# Altium PCB EEM_FMC_Carrier.PcbDoc (part 11 of 19)
Units mm, origin at the board's own origin, x right, y up, seen from the top; angles counter-clockwise.
Board outline 222.9 x 100 mm, 6 copper layers (TopLayer, MidLayer1, MidLayer2, SignalLayer1, Internal Plane 1, BottomLayer), stack 1.528 mm thick; 790 components, 743 nets, 3570 pads, 2277 vias.
Unrouted connection lines stored in the file: 3.
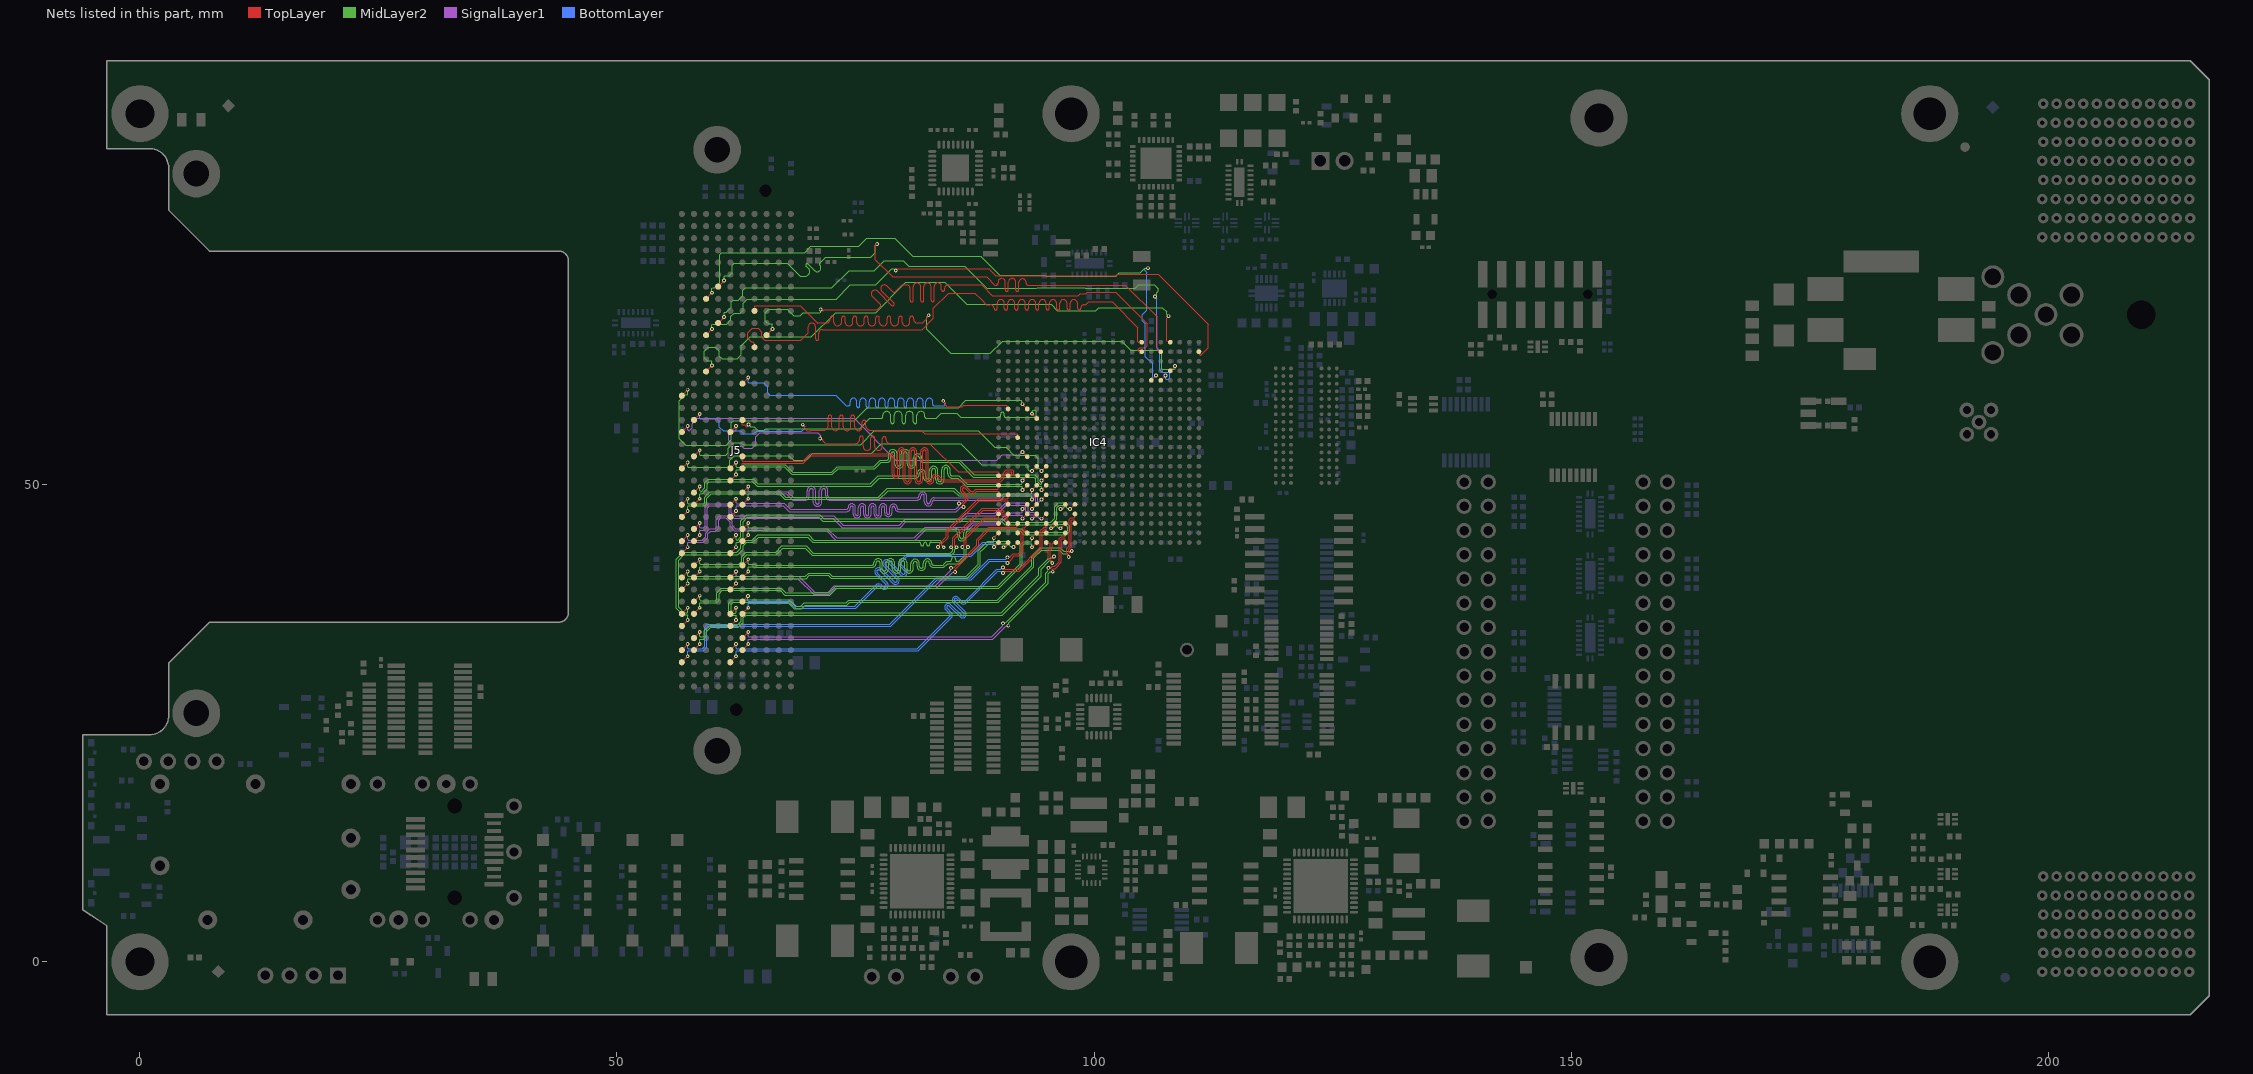
[diagram p13: the nets of this part, all layers, seen from the top]

## Via types
v1: diameter 0.4, hole 0.2, TopLayer to BottomLayer, tented both sides, 1032 vias
v2: diameter 0.5, hole 0.2, TopLayer to BottomLayer, tented both sides, 979 vias
v3: diameter 0.5, hole 0.2, TopLayer to BottomLayer, 162 vias
v4: diameter 0.8, hole 0.5, TopLayer to BottomLayer, tented both sides, 102 vias
v5: diameter 0.6, hole 0.3, TopLayer to BottomLayer, tented both sides, 2 vias

## Nets (pads, with @x,y where several pads share a name; then routed paths per layer and width w, separated by ;. In a path a pad name is that pad's centre, name@x,y a point inside that pad or via, vN(x,y) a via of type N, cw(c..) or ccw(c..) an arc to the next point about the centre after c; other vN are vias at no path point) (continued)
FMC.HA_P16: IC4.H2 J5.e15 | length 44.7
  TopLayer w0.085: J5.e15@63.148,60.609 63.758,61.219 v1(63.758,61.24) ; v1(84.2,58.802) 84.2,58.779 84.385,58.594 84.385,58.389 84.582,58.192 86.192,58.192 86.344,58.344 87.387,58.344 ; 87.412,58.344 90.787,58.344 90.919,58.212 90.919,58.029 IC4.H2@90.998,57.95
  BottomLayer w0.085: v1(63.758,61.24) 63.758,60.761 63.808,60.711 65.389,60.711 65.8,60.3 65.8,59.65 66.038,59.412 72.913,59.412 74.025,58.3 74.142,58.3 74.29,58.3 ccw(c74.29,58.442) 74.433,58.442 74.433,58.72 cw(c74.787,58.72) 74.787,59.074 cw(c74.787,58.72) 75.142,58.72 75.142,58.244 ccw(c75.284,58.244) 75.284,58.101 ccw(c75.284,58.244) 75.427,58.244 75.427,58.72 cw(c75.781,58.72) 75.781,59.074 cw(c75.781,58.72) 76.136,58.72 76.136,58.244 ccw(c76.278,58.244) 76.278,58.101 ccw(c76.278,58.244) 76.421,58.244 76.421,58.72 cw(c76.775,58.72) 76.775,59.074 cw(c76.775,58.72) 77.13,58.72 77.13,58.244 ccw(c77.272,58.244) 77.272,58.101 ccw(c77.272,58.244) 77.415,58.244 77.415,58.72 cw(c77.769,58.72) 77.769,59.074 cw(c77.769,58.72) 78.124,58.72 78.124,58.244 ccw(c78.266,58.244) 78.266,58.101 ccw(c78.266,58.244) 78.409,58.244 78.409,58.72 cw(c78.763,58.72) 78.763,59.074 cw(c78.763,58.72) 79.118,58.72 79.118,58.244 ccw(c79.26,58.244) 79.26,58.101 ccw(c79.26,58.244) 79.403,58.244 79.403,58.72 cw(c79.757,58.72) 79.757,59.074 cw(c79.757,58.72) 80.112,58.72 80.112,58.244 ccw(c80.254,58.244) 80.254,58.101 ccw(c80.254,58.244) 80.397,58.244 80.397,58.72 cw(c80.751,58.72) 80.751,59.074 cw(c80.751,58.72) 81.106,58.72 81.106,58.244 ccw(c81.248,58.244) 81.248,58.101 ccw(c81.248,58.244) 81.391,58.244 81.391,58.72 cw(c81.745,58.72) 81.745,59.074 cw(c81.745,58.72) 82.1,58.72 82.1,58.244 ccw(c82.242,58.244) 82.242,58.101 ccw(c82.242,58.244) 82.385,58.244 82.385,58.72 cw(c82.739,58.72) 82.739,59.074 cw(c82.739,58.72) 83.094,58.72 83.094,58.442 ccw(c83.236,58.442) 83.236,58.3 84.22,58.3 84.349,58.3 84.399,58.35 84.399,58.608 84.205,58.802 v1(84.2,58.802)
FMC.HA_P17: IC4.H4 J5.k16 | length 46.8
  TopLayer w0.085: J5.k16@56.798,59.339 57.408,59.949 v1(57.408,59.97) ; v1(92.498,58.45) IC4.H4@92.998,57.95
  MidLayer2 w0.11: v1(57.408,59.97) 57.408,59.518 57.344,59.454 57.154,59.454 56.513,58.812 56.513,54.827 57.184,54.156 61.431,54.156 61.975,54.7 61.975,56.5 62.213,56.738 74.888,56.738 76.25,58.1 85.825,58.1 86.563,58.838 88.498,58.838 89.474,58.838 92.378,58.838 92.442,58.774 92.442,58.506 v1(92.498,58.45)
FMC.HA_P18: IC4.L3 J5.j18 | length 47.2
  TopLayer w0.085: J5.j18@58.068,56.799 58.678,57.409 v1(58.678,57.43) ; v1(69.473,56.3) 69.473,56.294 69.667,56.1 69.667,55.937 69.804,55.8 69.916,55.688 70.292,55.688 70.342,55.738 71.575,55.738 71.724,55.738 ccw(c71.724,56.142) 72.128,56.142 72.128,57.104 cw(c72.321,57.104) 72.321,57.296 cw(c72.321,57.104) 72.513,57.104 72.513,56.083 ccw(c72.918,56.083) 72.918,55.679 ccw(c72.918,56.083) 73.322,56.083 73.322,57.104 cw(c73.515,57.104) 73.515,57.296 cw(c73.515,57.104) 73.707,57.104 73.707,56.083 ccw(c74.112,56.083) 74.112,55.679 ccw(c74.112,56.083) 74.516,56.083 74.516,57.104 cw(c74.709,57.104) 74.709,57.296 cw(c74.709,57.104) 74.901,57.104 74.901,56.083 ccw(c75.306,56.083) 75.306,55.679 ccw(c75.306,56.083) 75.71,56.083 75.71,56.584 cw(c75.903,56.584) 75.903,56.776 cw(c75.903,56.584) 76.095,56.584 76.095,56.142 ccw(c76.5,56.142) 76.5,55.738 77.491,55.738 81.122,55.738 81.837,55.738 82.242,55.333 91.948,55.333 91.998,55.283 IC4.L3@91.998,54.95
  BottomLayer w0.085: v1(58.678,57.43) 58.678,56.951 58.728,56.901 60.449,56.901 60.65,56.7 60.737,56.613 60.737,56.025 61.112,55.65 62.975,55.65 63.294,55.331 64.332,55.331 64.625,55.625 69.375,55.625 69.667,55.917 69.667,56.101 69.473,56.295 v1(69.473,56.3)
FMC.HA_P19: IC4.R1 J5.f19 | length 40.9
  TopLayer w0.085: J5.f19@61.878,55.529 62.488,56.139 v1(62.488,56.16) ; v1(71.298,54.849) 71.383,54.849 71.469,54.763 71.505,54.763 71.555,54.713 71.555,54.609 71.778,54.386 71.84,54.325 74.875,54.325 75.024,54.325 ccw(c75.024,54.729) 75.428,54.729 75.428,54.909 cw(c75.621,54.909) 75.621,55.101 cw(c75.621,54.909) 75.813,54.909 75.813,54.021 ccw(c76.218,54.021) 76.218,53.617 ccw(c76.218,54.021) 76.622,54.021 76.622,54.909 cw(c76.815,54.909) 76.815,55.101 cw(c76.815,54.909) 77.007,54.909 77.007,54.021 ccw(c77.412,54.021) 77.412,53.617 ccw(c77.412,54.021) 77.816,54.021 77.816,54.842 cw(c78.009,54.842) 78.009,55.035 cw(c78.009,54.842) 78.201,54.842 78.201,54.729 ccw(c78.606,54.729) 78.606,54.325 79.13,54.325 82.8,54.325 85.781,51.344 89.948,51.344 89.998,51.294 IC4.R1@89.998,50.95
  SignalLayer1 w0.11: v1(62.488,56.16) 62.488,55.757 62.375,55.644 61.952,55.644 61.713,55.405 61.713,54.652 62.302,54.063 63.102,54.063 63.309,53.856 64.156,53.856 64.537,54.237 64.537,55.037 64.975,55.475 71.037,55.475 71.362,55.149 71.362,55.058 71.353,55.049 71.353,54.904 v1(71.298,54.849)
FMC.HA_P20: IC4.J5 J5.e18 | length 42.5
  TopLayer w0.085: J5.e18@63.148,56.799 63.148,56.32 63.198,56.27 63.389,56.27 63.565,56.094 63.636,56.094 63.798,56.256 v1(63.798,56.325) ; v1(93.498,57.45) IC4.J5@93.998,56.95
  MidLayer2 w0.11: v1(63.798,56.325) 63.798,56.312 64.004,56.106 64.369,56.106 64.75,55.725 65.44,55.725 65.59,55.875 75.425,55.875 76.518,56.968 77.5,56.968 77.674,56.968 ccw(c77.674,57.148) 77.854,57.148 77.854,57.273 cw(c78.271,57.273) 78.688,57.273 78.688,56.593 ccw(c78.868,56.593) 79.048,56.593 79.048,57.273 cw(c79.465,57.273) 79.881,57.273 79.881,56.593 ccw(c80.061,56.593) 80.241,56.593 80.241,57.273 cw(c80.658,57.273) 81.075,57.273 81.075,56.593 ccw(c81.255,56.593) 81.435,56.593 81.435,57.273 cw(c81.852,57.273) 82.269,57.273 82.269,57.148 ccw(c82.449,57.148) 82.449,56.968 83.457,56.968 83.506,57.017 83.99,57.5 85.6,57.5 86.025,57.075 89.975,57.075 90.03,57.075 ccw(c90.03,57.255) 90.21,57.255 90.21,57.42 cw(c90.39,57.42) 90.57,57.42 90.57,57.255 ccw(c90.75,57.255) 90.75,57.075 91.2,57.075 93.8,57.075 93.925,57.2 93.925,57.7 93.793,57.832 93.65,57.832 93.531,57.713 93.531,57.483 v1(93.498,57.45)
FMC.HA_P21: IC4.N4 J5.k19 | length 40.1
  TopLayer w0.085: J5.k19@56.798,55.529 57.408,56.139 v1(57.408,56.16) ; v1(92.498,53.45) IC4.N4@92.998,52.95
  SignalLayer1 w0.11: v1(57.408,56.16) 57.408,55.785 57.504,55.689 57.596,55.689 57.866,55.959 57.866,56.391 58.437,56.962 74.848,56.962 79.235,52.575 89.8,52.575 90.375,53.15 91.839,53.15 91.91,53.079 92.127,53.079 v1(92.498,53.45)
FMC.HA_P22: IC4.P6 J5.j21 | length 41.7
  TopLayer w0.085: J5.j21@58.068,52.989 58.678,53.599 v1(58.678,53.62) ; v1(94.498,51.45) IC4.P6@94.998,51.95
  MidLayer2 w0.11: v1(58.678,53.62) 58.678,53.168 58.742,53.104 61.392,53.104 61.663,53.375 61.663,53.823 62.227,54.387 63.048,54.387 63.216,54.219 75.544,54.219 76.975,55.65 87.862,55.65 89.575,53.937 90.788,53.937 91.606,53.119 93.838,53.119 94.167,52.79 94.167,51.951 94.158,51.942 94.158,51.79 v1(94.498,51.45)
FMC.HA_P23: IC4.P5 J5.k22 | length 41.3
  TopLayer w0.085: J5.k22@56.798,51.719 57.408,52.329 v1(57.408,52.35) ; v1(93.498,51.45) IC4.P5@93.998,51.95
  MidLayer2 w0.11: v1(57.408,52.35) 57.408,51.898 57.472,51.834 61.573,51.834 61.813,52.073 61.813,52.598 62.277,53.062 68.013,53.062 68.525,52.55 69.765,52.55 70.54,53.325 76.69,53.325 77.677,54.312 86.013,54.312 88.213,52.112 92.913,52.112 93.116,51.909 93.116,51.575 93.222,51.47 93.478,51.47 v1(93.498,51.45)
FMC.HB_N0: IC4.U5 J5.k26 | length 40.2
  TopLayer w0.085: J5.k26@56.798,46.639 57.408,47.249 v1(57.408,47.27) ; v1(93.498,48.45) IC4.U5@93.998,48.95
  MidLayer2 w0.11: v1(57.408,47.27) 57.408,47.722 57.472,47.787 59.185,47.787 59.425,48.027 59.425,48.588 59.894,49.057 67.007,49.057 67.602,48.463 77.488,48.463 78.413,49.388 85.27,49.388 85.827,48.831 93.434,48.831 93.498,48.767 v1(93.498,48.45)
FMC.HB_N1: IC4.T4 J5.j25 | length 43.6
  TopLayer w0.085: J5.j25@58.068,47.909 58.678,48.519 v1(58.678,48.54) ; v1(92.498,49.45) IC4.T4@92.998,49.95
  MidLayer2 w0.11: v1(58.678,48.54) 58.678,48.992 58.742,49.057 58.932,49.057 59.45,49.575 59.45,50.1 59.675,50.325 64.215,50.325 64.677,49.863 76.663,49.863 77.5,50.7 80.477,50.7 81.249,50.7 ccw(c81.249,51.142) 81.691,51.142 cw(c81.896,51.142) 81.896,51.347 cw(c81.896,51.142) 82.101,51.142 82.101,50.818 ccw(c82.543,50.818) 82.543,50.376 ccw(c82.543,50.818) 82.985,50.818 82.985,51.495 cw(c83.19,51.495) 83.19,51.7 cw(c83.19,51.495) 83.395,51.495 83.395,50.543 ccw(c83.837,50.543) 83.837,50.101 ccw(c83.837,50.543) 84.279,50.543 84.279,51.596 cw(c84.484,51.596) 84.484,51.801 cw(c84.484,51.596) 84.689,51.596 84.689,51.142 ccw(c85.131,51.142) 85.131,50.7 85.74,50.7 86.275,50.165 86.608,49.831 92.4,49.831 92.492,49.74 92.492,49.456 v1(92.498,49.45)
FMC.HB_N2: IC4.T6 J5.f23 | length 43.1
  TopLayer w0.085: J5.f23@61.878,50.449 62.488,51.059 v1(62.488,51.08) ; v1(94.498,49.45) IC4.T6@94.998,49.95
  MidLayer2 w0.11: v1(62.488,51.08) 62.488,51.532 62.553,51.596 63.146,51.596 63.425,51.875 67.54,51.875 68.327,51.088 72.588,51.088 73.181,51.681 77.031,51.681 77.7,52.35 78.1,52.35 78.274,52.35 ccw(c78.274,52.792) 78.716,52.792 78.716,53.239 cw(c78.921,53.239) 78.921,53.444 cw(c78.921,53.239) 79.126,53.239 79.126,52.177 ccw(c79.568,52.177) 79.568,51.735 ccw(c79.568,52.177) 80.009,52.177 80.009,53.239 cw(c80.214,53.239) 80.214,53.444 cw(c80.215,53.239) 80.419,53.239 80.419,52.188 ccw(c80.861,52.188) 80.861,51.746 ccw(c80.861,52.188) 81.303,52.188 81.303,52.792 cw(c81.508,52.792) 81.508,52.997 cw(c81.508,52.792) 81.713,52.792 ccw(c82.155,52.792) 82.155,52.35 83.017,52.35 85.815,52.35 87.352,50.813 93.702,50.813 93.9,50.615 93.9,50.176 94.244,49.831 94.434,49.831 94.498,49.767 v1(94.498,49.45)
FMC.HB_N3: IC4.R2 J5.e22 | length 52.4
  TopLayer w0.085: J5.e22@63.148,51.719 63.148,52.198 63.198,52.248 69.548,52.248 70.35,53.05 78.146,53.05 78.642,53.05 cw(c78.642,52.858) 78.834,52.858 78.834,51.088 ccw(c79.239,51.088) 79.239,50.684 ccw(c79.239,51.088) 79.643,51.088 79.643,53.459 cw(c79.836,53.459) 79.836,53.652 cw(c79.836,53.459) 80.028,53.459 80.028,50.519 ccw(c80.433,50.519) 80.433,50.115 ccw(c80.433,50.519) 80.837,50.519 80.837,53.459 cw(c81.03,53.459) 81.03,53.652 cw(c81.03,53.459) 81.222,53.459 81.222,50.519 ccw(c81.627,50.519) 81.627,50.115 ccw(c81.627,50.519) 82.031,50.519 82.031,53.459 cw(c82.224,53.459) 82.224,53.652 cw(c82.224,53.459) 82.416,53.459 82.416,50.519 ccw(c82.821,50.519) 82.821,50.115 ccw(c82.821,50.519) 83.225,50.519 83.225,50.685 cw(c83.418,50.685) 83.554,50.821 83.777,50.598 83.865,50.51 84.037,50.338 90.225,50.338 90.591,50.704 90.591,51.041 90.907,51.357 91.244,51.357 91.272,51.385 91.342,51.385 91.392,51.335 91.392,51.025 91.326,50.959 91.007,50.959 IC4.R2@90.998,50.95
FMC.HB_N4: IC4.U1 J5.f26 | length 40.9
  TopLayer w0.085: J5.f26@61.878,46.639 62.488,47.249 v1(62.488,47.27) ; v1@86.31,47.668 86.298,47.68 86.298,47.941 86.579,48.221 86.684,48.326 ccw(c86.398,48.612) 86.715,48.863 86.715,48.867 86.685,48.897 ; 86.499,49.628 86.956,49.17 ccw(c87.242,49.456) 87.528,49.17 87.696,49.338 87.909,49.338 89.948,49.338 89.998,49.288 IC4.U1@89.998,48.95 ; 86.498,49.628 ccw(c86.362,49.492) 86.226,49.629 ccw(c86.362,49.492) 86.226,49.356 86.684,48.898
  SignalLayer1 w0.11: v1(62.488,47.27) 62.488,47.7 62.575,47.787 63.299,47.787 63.326,47.813 67.437,47.813 68.062,47.188 73.886,47.188 74.059,47.188 ccw(c74.059,47.58) 74.451,47.58 74.451,47.618 cw(c74.606,47.618) 74.606,47.773 cw(c74.606,47.618) 74.761,47.618 74.761,46.928 ccw(c75.153,46.928) 75.153,46.536 ccw(c75.153,46.928) 75.545,46.928 75.545,47.618 cw(c75.7,47.618) 75.7,47.773 cw(c75.7,47.618) 75.855,47.618 75.855,46.928 ccw(c76.247,46.928) 76.247,46.536 ccw(c76.247,46.928) 76.639,46.928 76.639,47.618 cw(c76.794,47.618) 76.794,47.773 cw(c76.794,47.618) 76.949,47.618 76.949,46.928 ccw(c77.341,46.928) 77.341,46.536 ccw(c77.341,46.928) 77.733,46.928 77.733,47.618 cw(c77.888,47.618) 77.888,47.773 cw(c77.888,47.618) 78.043,47.618 78.043,47.064 ccw(c78.435,47.064) 78.435,46.672 ccw(c78.435,47.064) 78.827,47.064 78.827,47.58 cw(c78.982,47.58) 78.982,47.735 cw(c78.982,47.58) 79.137,47.58 ccw(c79.529,47.58) 79.529,47.188 80.95,47.188 85.581,47.188 86.035,47.642 86.289,47.642 v1(86.31,47.663)
FMC.HB_N5: IC4.V5 J5.e25 | length 40.8
  TopLayer w0.085: J5.e25@63.148,47.909 63.758,48.519 v1(63.758,48.54) ; v1(93.498,47.45) IC4.V5@93.998,47.95
  SignalLayer1 w0.11: v1(63.758,48.54) 63.758,48.992 63.822,49.057 67.743,49.057 68.412,48.388 69.55,48.388 69.724,48.388 ccw(c69.724,48.83) 70.166,48.83 70.166,49.391 cw(c70.371,49.391) 70.371,49.596 cw(c70.371,49.391) 70.576,49.391 70.576,48.186 ccw(c71.018,48.186) 71.018,47.744 ccw(c71.018,48.186) 71.46,48.186 71.46,49.391 cw(c71.664,49.391) 71.664,49.596 cw(c71.665,49.391) 71.87,49.391 71.87,48.83 ccw(c72.311,48.83) 72.311,48.388 73.1,48.388 81.275,48.388 81.449,48.388 ccw(c81.449,48.805) 81.866,48.805 81.866,48.827 cw(c82.046,48.827) 82.226,48.827 82.226,48.208 ccw(c82.643,48.208) 83.06,48.208 cw(c83.24,48.208) 83.24,48.388 84.025,48.388 90.215,48.388 90.657,48.83 93.685,48.83 93.883,48.632 93.883,47.835 v1(93.498,47.45)
FMC.HB_N6: IC4.W4 J5.k29 | length 41.6
  TopLayer w0.085: J5.k29@56.798,42.829 57.408,43.439 v1(57.408,43.46) ; v1(92.498,46.45) IC4.W4@92.998,46.95
  SignalLayer1 w0.11: v1(57.408,43.46) 57.408,43.912 57.472,43.977 59.032,43.977 59.525,44.469 59.525,44.85 59.813,45.138 60.363,45.138 60.65,45.425 60.65,46.3 60.875,46.525 61.425,46.525 61.85,46.1 61.85,45.64 62.315,45.175 71.965,45.175 72.952,44.188 81.273,44.188 82.416,45.331 86.931,45.331 87.388,45.788 90.038,45.788 91.081,46.831 92.434,46.831 92.498,46.767 v1(92.498,46.45)
FMC.HB_N7: IC4.W5 J5.j28 | length 43
  TopLayer w0.085: J5.j28@58.068,44.099 58.678,44.709 v1(58.678,44.73) ; v1(93.498,46.45) IC4.W5@93.998,46.95
  SignalLayer1 w0.11: v1(58.678,44.73) 58.678,45.182 58.742,45.247 59.157,45.247 59.475,45.565 59.475,47.54 59.735,47.8 61.575,47.8 61.763,47.612 61.763,46.977 62.24,46.5 72.64,46.5 73.627,45.513 79.673,45.513 80.291,46.131 86.056,46.131 86.688,46.763 89.713,46.763 90.825,47.875 92.675,47.875 92.863,47.687 92.863,47.162 93.143,46.882 93.673,46.882 93.834,46.721 93.834,46.629 93.71,46.505 93.553,46.505 v1(93.498,46.45)
FMC.HB_N8: IC4.V8 J5.f29 | length 41.1
  TopLayer w0.085: J5.f29@61.878,42.829 62.488,43.439 v1(62.488,43.46) ; v1(96.498,47.45) IC4.V8@96.998,47.95
  MidLayer2 w0.11: v1(62.488,43.46) 62.488,43.912 62.552,43.977 62.742,43.977 63.225,44.46 63.225,46.15 63.675,46.6 71.14,46.6 71.552,46.188 88.498,46.188 90.302,46.188 90.652,45.838 95.548,45.838 96.1,46.39 96.1,47.614 96.368,47.882 96.815,47.882 96.879,47.818 96.879,47.65 96.735,47.505 96.553,47.505 v1(96.498,47.45)
FMC.HB_N9: IC4.Y7 J5.e28 | length 40.6
  TopLayer w0.085: J5.e28@63.148,44.099 63.758,44.709 v1(63.758,44.73) ; v1(95.498,45.45) IC4.Y7@95.998,45.95
  MidLayer2 w0.11: v1(63.758,44.73) 63.758,45.182 63.822,45.247 65.207,45.247 65.291,45.163 84.675,45.163 85.496,45.163 cw(c85.496,44.958) 85.701,44.958 85.701,44.564 ccw(c86.143,44.564) 86.143,44.122 ccw(c86.143,44.564) 86.585,44.564 86.585,44.958 cw(c86.789,44.958) 86.789,45.163 87.544,45.163 92.277,45.163 92.659,44.781 97.091,44.781 97.462,45.152 97.462,45.648 96.991,46.119 96.25,46.119 95.925,45.794 95.925,45.696 95.735,45.505 95.553,45.505 v1(95.498,45.45)
FMC.HB_N10: IC4.AB2 J5.k32 | length 38.8
  TopLayer w0.085: J5.k32@56.798,39.019 57.408,39.629 v1(57.408,39.65) ; v1(90.498,43.458) 90.502,43.458 90.994,43.95 IC4.AB2@90.998,43.95
  MidLayer2 w0.11: v1(57.408,39.65) 57.408,40.102 57.472,40.167 69.842,40.167 70.175,40.5 72.14,40.5 72.44,40.2 86.723,40.2 88.1,41.577 88.1,42.975 88.498,43.373 88.964,43.839 90.733,43.839 90.744,43.85 90.836,43.85 90.9,43.786 90.9,43.645 90.753,43.499 90.539,43.499 v1(90.498,43.458)
FMC.HB_N11: IC4.Y2 J5.j31 | length 39
  TopLayer w0.085: J5.j31@58.068,40.289 58.678,40.899 v1(58.678,40.92) ; v1(85.598,43.458) 85.598,43.464 85.404,43.657 85.404,44.354 88.4,47.35 90.138,47.35 90.395,47.093 90.395,46.718 90.769,46.344 90.948,46.344 90.998,46.294 IC4.Y2@90.998,45.95
  MidLayer2 w0.11: v1(58.678,40.92) 58.678,41.372 58.742,41.437 62.836,41.437 63.3,41.9 63.3,42.375 63.613,42.688 66.713,42.688 67.375,43.35 69.74,43.35 70.477,42.613 85.036,42.613 85.416,42.993 85.416,43.248 85.598,43.43 v1(85.598,43.458)
FMC.HB_N12: IC4.AA3 J5.f32 | length 35.2
  TopLayer w0.085: J5.f32@61.878,39.019 62.488,39.629 v1(62.488,39.65) ; v1(85.448,40.875) 85.451,40.878 85.451,41.153 87.9,43.601 87.9,44.175 89.069,45.344 91.85,45.344 91.939,45.255 91.939,45.009 IC4.AA3@91.998,44.95
  SignalLayer1 w0.11: v1(62.488,39.65) 62.488,40.102 62.552,40.167 68.972,40.167 70.631,38.507 72.232,38.507 72.888,39.163 83.479,39.163 85.172,40.855 85.428,40.855 v1(85.448,40.875)
FMC.HB_N13: IC4.Y1 J5.e31 | length 39.4
  TopLayer w0.085: J5.e31@63.148,40.289 63.758,40.899 v1(63.758,40.92) ; v1(86.798,43.477) 86.798,43.481 86.604,43.675 86.604,44.379 88.498,46.273 88.569,46.344 89.948,46.344 89.998,46.294 IC4.Y1@89.998,45.95
  MidLayer2 w0.11: v1(63.758,40.92) 63.758,41.372 63.822,41.437 64.346,41.437 64.436,41.346 76.55,41.346 76.724,41.346 ccw(c76.724,41.788) 77.166,41.788 77.166,41.807 cw(c77.371,41.807) 77.371,42.012 cw(c77.371,41.807) 77.576,41.807 77.576,41.188 ccw(c78.018,41.188) 78.018,40.746 ccw(c78.018,41.188) 78.46,41.188 78.46,41.807 cw(c78.664,41.807) 78.664,42.012 cw(c78.665,41.807) 78.869,41.807 78.869,41.188 ccw(c79.311,41.188) 79.311,40.746 ccw(c79.311,41.188) 79.753,41.188 79.753,41.807 cw(c79.958,41.807) 79.958,42.012 cw(c79.958,41.807) 80.163,41.807 80.163,41.188 ccw(c80.605,41.188) 80.605,40.746 ccw(c80.605,41.188) 81.047,41.188 81.047,41.751 cw(c81.252,41.751) 81.252,41.956 cw(c81.252,41.751) 81.457,41.751 81.457,41.465 ccw(c81.899,41.465) 81.899,41.023 ccw(c81.899,41.465) 82.341,41.465 82.341,41.788 cw(c82.546,41.788) 82.546,41.993 cw(c82.546,41.788) 82.751,41.788 ccw(c83.193,41.788) 83.193,41.346 83.725,41.346 84.271,41.346 84.65,41.725 85.91,41.725 86.616,42.431 86.616,43.267 86.798,43.449 v1(86.798,43.477)
FMC.HB_N14: IC4.V2 J5.k35 | length 48
  TopLayer w0.085: J5.k35@56.798,35.209 57.408,35.819 v1(57.408,35.84) ; v1(84.248,43.458) 84.248,43.471 84.058,43.661 84.058,43.809 84.717,44.469 84.717,45.082 87.973,48.338 90.948,48.338 90.998,48.288 IC4.V2@90.998,47.95
  MidLayer2 w0.11: v1(57.408,35.84) 57.408,36.292 57.344,36.357 56.908,36.357 56.213,37.052 56.213,42.213 56.919,42.919 62.559,42.919 62.988,43.348 62.988,43.723 63.477,44.212 64.202,44.212 64.752,44.762 70.088,44.762 70.638,44.212 81.325,44.212 83.853,44.212 84.066,43.998 84.066,43.667 84.248,43.486 v1(84.248,43.458)
FMC.HB_N15: IC4.AB5 J5.j34 | length 41.8
  TopLayer w0.085: J5.j34@58.068,36.479 58.678,37.089 v1(58.678,37.11) ; v1(93.498,43.45) IC4.AB5@93.998,43.95
  MidLayer2 w0.11: v1(58.678,37.11) 58.678,37.562 58.742,37.627 60.427,37.627 60.7,37.9 60.7,38.6 61.032,38.932 67.107,38.932 67.608,38.432 72.307,38.432 73.013,39.138 90.023,39.138 92.5,41.615 92.5,43.6 92.71,43.81 93.434,43.81 93.498,43.746 v1(93.498,43.45)
FMC.HB_N16: IC4.Y9 J5.f35 | length 47.5
  TopLayer w0.085: J5.f35@61.878,35.209 62.488,35.819 v1(62.488,35.84) ; v1(97.671,43.056) 97.641,43.056 97.463,42.878 97.384,42.878 97.334,42.928 97.334,43.254 97.592,43.512 97.592,46.294 97.642,46.344 97.948,46.344 97.998,46.294 IC4.Y9@97.998,45.95
  MidLayer2 w0.11: v1(62.488,35.84) 62.488,36.261 62.424,36.326 62.089,36.326 61.716,36.699 61.716,37.576 62.077,37.937 68.013,37.937 68.7,37.25 69.275,37.25 69.643,37.618 74.007,37.618 74.302,37.912 89.875,37.912 93.463,41.5 93.463,42.448 93.465,42.45 94.402,43.387 96.448,43.387 96.814,43.021 97.363,43.021 97.37,43.014 97.629,43.014 v1(97.671,43.056)
FMC.HB_N17: IC4.AA4 J5.k38 | length 45.3
  TopLayer w0.085: J5.k38@56.798,31.399 57.408,32.009 v1(57.408,32.03) ; v1(90.923,41.8) 91,41.8 91.322,42.122 91.322,42.222 91.638,42.538 92.138,42.538 92.591,42.992 92.591,45.259 92.641,45.309 92.81,45.309 92.919,45.2 92.919,45.029 IC4.AA4@92.998,44.95
  BottomLayer w0.085: v1(57.408,32.03) 57.408,32.563 57.458,32.613 59.038,32.613 59.4,32.975 59.4,35 59.563,35.163 78.688,35.163 83.575,40.05 87.125,40.05 89.069,41.994 90.018,41.994 90.724,41.994 90.918,41.8 v1(90.923,41.8)
FMC.HB_N18: IC4.AB6 J5.j37 | length 45.5
  TopLayer w0.085: J5.j37@58.068,32.669 58.678,33.279 v1(58.678,33.3) ; IC4.AB6@94.998,43.95 95.045,43.903 95.314,43.903 95.392,43.825 95.392,43.375 95.221,43.204 95.221,42.298 95.447,42.072 95.49,42.072 95.54,42.023 95.54,41.99 95.628,41.902 v1(95.628,41.817)
  MidLayer2 w0.11: v1(58.678,33.3) 58.678,33.752 58.742,33.817 59.092,33.817 59.375,34.1 59.375,34.59 59.848,35.063 62.698,35.063 63.25,35.615 63.25,36.075 63.525,36.35 90.385,36.35 94.45,40.415 94.45,41.147 95.327,42.024 95.418,42.024 95.566,41.876 95.628,41.876 v1(95.628,41.817)
FMC.HB_N19: IC4.AB1 J5.e34 | length 41.1
  TopLayer w0.085: J5.e34@63.148,36.479 63.148,36.489 63.758,37.099 v1(63.758,37.11) ; v1(89.525,43.477) IC4.AB1@89.998,43.95
  BottomLayer w0.085: v1(63.758,37.11) 63.742,37.126 63.742,37.55 63.792,37.6 68.175,37.6 68.725,37.05 75,37.05 76.7,38.75 77.287,39.337 cw(c77.423,39.201) 77.56,39.337 77.734,39.163 ccw(c78.02,39.449) 78.306,39.163 78.307,39.164 ccw(c78.02,39.449) 78.306,39.735 77.287,40.754 cw(c77.423,40.89) 77.287,41.026 cw(c77.423,40.89) 77.559,41.026 78.896,39.689 ccw(c79.182,39.975) 79.468,39.689 79.469,39.69 ccw(c79.182,39.975) 79.468,40.261 78.131,41.598 cw(c78.267,41.734) 78.131,41.87 cw(c78.267,41.734) 78.403,41.87 79.74,40.533 ccw(c80.026,40.819) 80.313,40.533 80.314,40.534 ccw(c80.026,40.819) 80.313,41.105 79.82,41.598 cw(c79.956,41.734) 79.82,41.87 79.925,41.975 80.45,42.5 87.15,42.5 88.413,43.763 88.498,43.763 89.418,43.763 89.468,43.713 89.468,43.533 v1(89.525,43.477)
FMC.HB_N20: IC4.AA6 J5.f38 | length 46.4
  TopLayer w0.085: J5.f38@61.878,31.399 62.488,32.009 v1(62.488,32.03) ; v1(90.448,40.744) 90.454,40.744 90.648,40.938 92.186,40.938 94.592,43.344 94.592,45.079 94.857,45.344 94.948,45.344 94.998,45.294 IC4.AA6@94.998,44.95
  BottomLayer w0.085: v1(62.488,32.03) 62.488,32.532 62.538,32.582 81.554,32.582 84.936,35.964 85.042,36.07 ccw(c84.773,36.337) 85.041,36.605 84.596,37.051 cw(c84.714,37.169) 84.596,37.288 cw(c84.714,37.169) 84.833,37.288 85.97,36.151 ccw(c86.238,36.419) 86.505,36.15 86.507,36.152 ccw(c86.238,36.419) 86.506,36.688 85.396,37.798 cw(c85.514,37.917) 85.396,38.035 cw(c85.514,37.917) 85.633,38.035 86.051,37.617 ccw(c86.32,37.884) 86.588,37.616 86.952,37.98 89.91,40.938 90.249,40.938 90.443,40.744 v1(90.448,40.744)
FMC.HB_N21: IC4.AB8 J5.e37 | length 41.7
  TopLayer w0.085: J5.e37@63.148,32.669 63.758,33.279 v1(63.758,33.3) ; v1(95.672,40.894) 95.675,40.897 95.675,41.171 95.729,41.225 95.95,41.225 96.591,41.867 96.591,44.294 96.641,44.344 96.948,44.344 96.998,44.294 IC4.AB8@96.998,43.95
  MidLayer2 w0.11: v1(91.018,35.231) 91.048,35.261 91.048,35.548 95.179,39.679 95.179,40.657 95.243,40.722 95.395,40.874 95.652,40.874 v1(95.672,40.894)
  SignalLayer1 w0.11: v1(63.758,33.3) 63.758,33.752 63.822,33.817 89.392,33.817 90.764,35.189 90.976,35.189 v1(91.018,35.231)
FMC.HB_P0: IC4.T5 J5.k25 | length 40.2
  TopLayer w0.085: J5.k25@56.798,47.909 57.408,48.519 v1(57.408,48.54) ; v1(93.498,49.45) IC4.T5@93.998,49.95
  MidLayer2 w0.11: v1(57.408,48.54) 57.408,48.088 57.472,48.024 59.087,48.024 59.188,48.125 59.188,48.686 59.796,49.294 67.106,49.294 67.7,48.7 77.39,48.7 78.315,49.625 85.368,49.625 85.925,49.068 93.434,49.068 93.498,49.133 v1(93.498,49.45)
FMC.HB_P1: IC4.R4 J5.j24 | length 43.6
  TopLayer w0.085: J5.j24@58.068,49.179 58.678,49.789 v1(58.678,49.81) ; v1(92.498,50.45) IC4.R4@92.998,50.95
  MidLayer2 w0.11: v1(58.678,49.81) 58.678,49.358 58.742,49.294 58.834,49.294 59.213,49.673 59.213,50.198 59.577,50.562 64.313,50.562 64.775,50.1 76.565,50.1 77.402,50.937 80.477,50.937 81.249,50.937 ccw(c81.249,51.142) 81.454,51.142 cw(c81.896,51.142) 81.896,51.584 cw(c81.896,51.142) 82.338,51.142 82.338,50.818 ccw(c82.543,50.818) 82.543,50.613 ccw(c82.543,50.818) 82.748,50.818 82.748,51.495 cw(c83.19,51.495) 83.19,51.937 cw(c83.19,51.495) 83.632,51.495 83.632,50.543 ccw(c83.837,50.543) 83.837,50.338 ccw(c83.837,50.543) 84.042,50.543 84.042,51.596 cw(c84.484,51.596) 84.484,52.038 cw(c84.484,51.596) 84.926,51.596 84.926,51.142 ccw(c85.131,51.142) 85.131,50.937 85.838,50.937 86.275,50.5 86.707,50.068 92.4,50.068 92.492,50.16 92.492,50.444 v1(92.498,50.45)
FMC.HB_P2: IC4.R6 J5.f22 | length 43.1
  TopLayer w0.085: J5.f22@61.878,51.719 62.489,52.329 v1(62.489,52.35) ; v1(94.498,50.45) IC4.R6@94.998,50.95
  MidLayer2 w0.11: v1(62.489,52.35) 62.488,51.898 62.553,51.833 63.048,51.833 63.327,52.112 67.638,52.112 68.425,51.325 72.49,51.325 73.082,51.918 76.932,51.918 77.602,52.587 78.1,52.587 78.274,52.587 ccw(c78.274,52.792) 78.479,52.792 78.479,53.239 cw(c78.921,53.239) 78.921,53.681 cw(c78.921,53.239) 79.363,53.239 79.363,52.177 ccw(c79.568,52.177) 79.568,51.972 ccw(c79.568,52.177) 79.773,52.177 79.773,53.239 cw(c80.214,53.239) 80.214,53.681 cw(c80.215,53.239) 80.656,53.239 80.656,52.188 ccw(c80.861,52.188) 80.861,51.983 ccw(c80.861,52.188) 81.066,52.188 81.066,52.792 cw(c81.508,52.792) 81.508,53.234 cw(c81.508,52.792) 81.95,52.792 ccw(c82.155,52.792) 82.155,52.587 83.017,52.587 85.913,52.587 87.45,51.05 93.8,51.05 94.137,50.713 94.137,50.418 94.137,50.274 94.342,50.068 94.434,50.068 94.498,50.133 v1(94.498,50.45)
FMC.HB_P3: IC4.R3 J5.e21 | length 52.8
  TopLayer w0.085: J5.e21@63.148,52.989 63.148,52.51 63.198,52.46 69.46,52.46 70.262,53.262 78.146,53.262 78.642,53.262 cw(c78.642,52.858) 79.046,52.858 79.046,51.088 ccw(c79.239,51.088) 79.239,50.896 ccw(c79.239,51.088) 79.431,51.088 79.431,53.459 cw(c79.836,53.459) 79.836,53.864 cw(c79.836,53.459) 80.24,53.459 80.24,50.519 ccw(c80.433,50.519) 80.433,50.327 ccw(c80.433,50.519) 80.625,50.519 80.625,53.459 cw(c81.03,53.459) 81.03,53.864 cw(c81.03,53.459) 81.434,53.459 81.434,50.519 ccw(c81.627,50.519) 81.627,50.327 ccw(c81.627,50.519) 81.819,50.519 81.819,53.459 cw(c82.224,53.459) 82.224,53.864 cw(c82.224,53.459) 82.628,53.459 82.628,50.519 ccw(c82.821,50.519) 82.821,50.327 ccw(c82.821,50.519) 83.013,50.519 83.013,50.685 cw(c83.418,50.685) 83.669,51.002 83.673,51.002 83.703,50.972 ; 83.704,50.971 83.865,50.81 84.125,50.55 90.137,50.55 90.379,50.792 90.379,51.129 90.819,51.569 91.156,51.569 91.184,51.597 91.43,51.597 91.604,51.423 91.604,51.025 91.67,50.959 91.989,50.959 IC4.R3@91.998,50.95
FMC.HB_P4: IC4.T1 J5.f25 | length 40.9
  TopLayer w0.085: J5.f25@61.878,47.909 62.488,48.519 v1(62.488,48.54) ; v1(85.845,48.042) 85.864,48.061 86.119,48.061 86.429,48.371 86.534,48.476 ccw(c86.398,48.612) 86.533,48.749 86.077,49.206 cw(c86.362,49.492) 86.076,49.778 86.077,49.78 cw(c86.362,49.492) 86.613,49.809 86.617,49.809 87.106,49.32 ccw(c87.242,49.456) 87.378,49.32 87.608,49.55 87.811,49.55 89.898,49.55 89.947,49.6 89.947,49.899 IC4.T1@89.998,49.95
  SignalLayer1 w0.11: v1(62.488,48.54) 62.488,48.111 62.575,48.024 63.201,48.024 63.227,48.05 67.535,48.05 68.16,47.425 73.886,47.425 74.059,47.425 ccw(c74.059,47.58) 74.214,47.58 74.214,47.618 cw(c74.606,47.618) 74.606,48.01 cw(c74.606,47.618) 74.998,47.618 74.998,46.928 ccw(c75.153,46.928) 75.153,46.773 ccw(c75.153,46.928) 75.308,46.928 75.308,47.618 cw(c75.7,47.618) 75.7,48.01 cw(c75.7,47.618) 76.092,47.618 76.092,46.928 ccw(c76.247,46.928) 76.247,46.773 ccw(c76.247,46.928) 76.402,46.928 76.402,47.618 cw(c76.794,47.618) 76.794,48.01 cw(c76.794,47.618) 77.186,47.618 77.186,46.928 ccw(c77.341,46.928) 77.341,46.773 ccw(c77.341,46.928) 77.496,46.928 77.496,47.618 cw(c77.888,47.618) 77.888,48.01 cw(c77.888,47.618) 78.28,47.618 78.28,47.064 ccw(c78.435,47.064) 78.435,46.909 ccw(c78.435,47.064) 78.59,47.064 78.59,47.58 cw(c78.982,47.58) 78.982,47.972 cw(c78.982,47.58) 79.374,47.58 ccw(c79.529,47.58) 79.529,47.425 80.95,47.425 85.483,47.425 85.824,47.767 85.824,48.021 v1(85.845,48.042)
FMC.HB_P5: IC4.U6 J5.e24 | length 40.6
  TopLayer w0.085: J5.e24@63.148,49.179 63.758,49.789 v1(63.758,49.81) ; v1(94.498,48.45) IC4.U6@94.998,48.95
  SignalLayer1 w0.11: v1(63.758,49.81) 63.758,49.358 63.822,49.294 67.842,49.294 68.51,48.625 69.55,48.625 69.724,48.625 ccw(c69.724,48.83) 69.929,48.83 69.929,49.391 cw(c70.371,49.391) 70.371,49.833 cw(c70.371,49.391) 70.813,49.391 70.813,48.186 ccw(c71.018,48.186) 71.018,47.981 ccw(c71.018,48.186) 71.223,48.186 71.223,49.391 cw(c71.664,49.391) 71.664,49.833 cw(c71.665,49.391) 72.106,49.391 72.106,48.83 ccw(c72.311,48.83) 72.311,48.625 73.1,48.625 81.275,48.625 81.449,48.625 ccw(c81.449,48.805) 81.629,48.805 81.629,48.827 cw(c82.046,48.827) 82.463,48.827 82.463,48.208 ccw(c82.643,48.208) 82.823,48.208 cw(c83.24,48.208) 83.24,48.625 84.025,48.625 90.117,48.625 90.559,49.067 93.783,49.067 94.12,48.73 94.12,48.292 94.184,48.227 94.275,48.227 v1(94.498,48.45)
FMC.HB_P6: IC4.V4 J5.k28 | length 41.6
  TopLayer w0.085: J5.k28@56.798,44.099 57.408,44.709 v1(57.408,44.73) ; v1(92.498,47.45) IC4.V4@92.998,47.95
  SignalLayer1 w0.11: v1(57.408,44.73) 57.408,44.278 57.472,44.214 58.934,44.214 59.288,44.568 59.288,44.948 59.715,45.375 60.265,45.375 60.413,45.523 60.413,46.398 60.777,46.762 61.523,46.762 62.087,46.198 62.087,45.738 62.413,45.412 72.063,45.412 73.05,44.425 81.175,44.425 82.318,45.568 86.832,45.568 87.29,46.025 89.94,46.025 90.983,47.068 92.434,47.068 92.498,47.133 v1(92.498,47.45)
FMC.HB_P7: IC4.W6 J5.j27 | length 43.5
  TopLayer w0.085: J5.j27@58.068,45.369 58.678,45.979 v1(58.678,46) ; v1(94.498,46.45) IC4.W6@94.998,46.95
  SignalLayer1 w0.11: v1(58.678,46) 58.678,45.548 58.742,45.484 59.059,45.484 59.238,45.663 59.238,47.638 59.637,48.037 61.673,48.037 62,47.71 62,47.075 62.338,46.737 72.738,46.737 73.725,45.75 77.075,45.75 79.575,45.75 80.193,46.368 85.957,46.368 86.59,47 89.615,47 90.727,48.112 92.773,48.112 93.1,47.785 93.1,47.26 93.241,47.119 93.771,47.119 94.071,46.819 94.071,46.721 94.286,46.505 94.442,46.505 v1(94.498,46.45)
FMC.HB_P8: IC4.V9 J5.f28 | length 41.5
  TopLayer w0.085: J5.f28@61.878,44.099 62.488,44.709 v1(62.488,44.73) ; v1(97.498,47.45) IC4.V9@97.998,47.95
  MidLayer2 w0.11: v1(62.488,44.73) 62.488,44.278 62.552,44.214 62.644,44.214 62.988,44.558 62.988,46.248 63.577,46.837 71.238,46.837 71.65,46.425 88.498,46.425 90.4,46.425 90.75,46.075 95.45,46.075 95.863,46.488 95.863,47.712 96.27,48.119 96.913,48.119 97.116,47.916 97.116,47.65 97.261,47.505 97.442,47.505 v1(97.498,47.45)
FMC.HB_P9: IC4.Y8 J5.e27 | length 39.4
  TopLayer w0.085: J5.e27@63.148,45.369 63.758,45.979 v1(63.758,46) ; v1(96.498,45.45) IC4.Y8@96.998,45.95
  MidLayer2 w0.11: v1(63.758,46) 63.758,45.548 63.822,45.484 65.306,45.484 65.389,45.4 84.675,45.4 85.496,45.4 cw(c85.496,44.958) 85.938,44.958 85.938,44.564 ccw(c86.143,44.564) 86.143,44.359 ccw(c86.143,44.564) 86.348,44.564 86.348,44.958 cw(c86.789,44.958) 86.789,45.4 87.544,45.4 92.375,45.4 92.757,45.018 96.993,45.018 97.225,45.25 97.225,45.55 96.893,45.882 96.348,45.882 96.162,45.696 96.162,45.604 96.261,45.505 96.442,45.505 v1(96.498,45.45)
FMC.HB_P10: IC4.AB3 J5.k31 | length 39.1
  TopLayer w0.085: J5.k31@56.798,40.289 57.408,40.899 v1(57.408,40.92) ; v1(91.548,43.477) 91.548,43.5 IC4.AB3@91.998,43.95
  MidLayer2 w0.11: v1(57.408,40.92) 57.408,40.468 57.472,40.404 69.743,40.404 70.077,40.737 72.238,40.737 72.538,40.437 86.625,40.437 87.863,41.675 87.863,43.073 88.498,43.708 88.866,44.076 90.635,44.076 90.646,44.087 90.934,44.087 91.137,43.884 91.137,43.655 91.283,43.508 91.517,43.508 v1(91.548,43.477)
FMC.HB_P11: IC4.W2 J5.j30 | length 38.9
  TopLayer w0.085: J5.j30@58.068,41.559 58.678,42.169 v1(58.678,42.19) ; v1(84.998,43.458) 84.998,43.464 85.192,43.657 85.192,44.442 88.312,47.562 90.226,47.562 90.607,47.181 90.607,46.806 90.857,46.556 90.948,46.556 90.998,46.606 IC4.W2@90.998,46.95
  MidLayer2 w0.11: v1(58.678,42.19) 58.678,41.738 58.742,41.674 62.738,41.674 63.063,41.998 63.063,42.473 63.515,42.925 66.615,42.925 67.277,43.587 69.838,43.587 70.575,42.85 84.938,42.85 85.179,43.091 85.179,43.248 84.998,43.43 v1(84.998,43.458)
FMC.HB_P12: IC4.Y3 J5.f31 | length 35.2
  TopLayer w0.085: J5.f31@61.878,40.289 62.488,40.899 v1(62.488,40.92) ; v1(85.024,41.299) 85.027,41.303 85.301,41.303 87.688,43.689 87.688,44.263 88.981,45.556 91.85,45.556 91.939,45.645 91.939,45.891 IC4.Y3@91.998,45.95
  SignalLayer1 w0.11: v1(62.488,40.92) 62.488,40.468 62.552,40.404 69.07,40.404 70.729,38.744 72.134,38.744 72.79,39.4 83.381,39.4 85.004,41.023 85.004,41.28 v1(85.024,41.299)
FMC.HB_P13: IC4.W1 J5.e30 | length 40
  TopLayer w0.085: J5.e30@63.148,41.559 63.758,42.169 v1(63.758,42.19) ; v1(86.198,43.477) 86.198,43.481 86.392,43.675 86.392,44.467 88.481,46.556 89.948,46.556 89.998,46.606 IC4.W1@89.998,46.95
  MidLayer2 w0.11: v1(63.758,42.19) 63.758,41.738 63.822,41.674 64.444,41.674 64.534,41.583 76.55,41.583 76.724,41.583 ccw(c76.724,41.788) 76.929,41.788 76.929,41.807 cw(c77.371,41.807) 77.371,42.249 cw(c77.371,41.807) 77.813,41.807 77.813,41.188 ccw(c78.018,41.188) 78.018,40.983 ccw(c78.018,41.188) 78.223,41.188 78.223,41.807 cw(c78.664,41.807) 78.664,42.249 cw(c78.665,41.807) 79.106,41.807 79.106,41.188 ccw(c79.311,41.188) 79.311,40.983 ccw(c79.311,41.188) 79.516,41.188 79.516,41.807 cw(c79.958,41.807) 79.958,42.249 cw(c79.958,41.807) 80.4,41.807 80.4,41.188 ccw(c80.605,41.188) 80.605,40.983 ccw(c80.605,41.188) 80.81,41.188 80.81,41.751 cw(c81.252,41.751) 81.252,42.193 cw(c81.252,41.751) 81.694,41.751 81.694,41.465 ccw(c81.899,41.465) 81.899,41.26 ccw(c81.899,41.465) 82.104,41.465 82.104,41.788 cw(c82.546,41.788) 82.546,42.23 cw(c82.546,41.788) 82.988,41.788 ccw(c83.193,41.788) 83.193,41.583 83.725,41.583 84.173,41.583 84.373,41.783 84.552,41.962 84.867,41.962 ccw(c84.867,42.167) 85.072,42.167 85.072,42.267 cw(c85.277,42.267) 85.277,42.472 cw(c85.277,42.267) 85.482,42.267 85.482,42.167 ccw(c85.687,42.167) 85.687,41.962 85.812,41.962 86.05,42.2 86.379,42.529 86.379,43.267 86.198,43.449 v1(86.198,43.477)
FMC.HB_P14: IC4.U2 J5.k34 | length 48.1
  TopLayer w0.085: J5.k34@56.798,36.479 57.408,37.089 v1(57.408,37.11) ; v1@83.653,43.481 83.655,43.481 83.846,43.672 83.846,43.897 84.505,44.557 84.505,45.17 87.885,48.55 90.948,48.55 90.998,48.6 90.998,48.941 IC4.U2@91.003,48.945
  MidLayer2 w0.11: v1(57.408,37.11) 57.408,36.658 57.344,36.594 57.007,36.594 56.45,37.15 56.45,42.115 57.018,42.682 62.657,42.682 63.225,43.25 63.225,43.625 63.575,43.975 64.3,43.975 64.85,44.525 69.99,44.525 70.54,43.975 81.325,43.975 81.69,43.975 cw(c81.69,43.82) 81.845,43.82 81.845,43.753 ccw(c82,43.753) 82,43.598 ccw(c82,43.753) 82.155,43.753 82.155,43.82 cw(c82.31,43.82) 82.31,43.975 cw(c82.31,43.82) 82.465,43.82 82.465,43.753 ccw(c82.62,43.753) 82.62,43.598 ccw(c82.62,43.753) 82.775,43.753 82.775,43.82 cw(c82.93,43.82) 82.93,43.975 83.15,43.975 83.754,43.975 83.829,43.9 83.829,43.686 83.648,43.505 v1(83.648,43.477)
FMC.HB_P15: IC4.AA5 J5.j33 | length 41.8
  TopLayer w0.085: J5.j33@58.068,37.749 58.678,38.359 v1(58.678,38.38) ; v1(93.498,44.407) 93.498,44.45 IC4.AA5@93.998,44.95
  MidLayer2 w0.11: v1(58.678,38.38) 58.678,37.928 58.742,37.864 60.328,37.864 60.463,37.998 60.463,38.698 60.934,39.169 67.206,39.169 67.706,38.669 72.209,38.669 72.915,39.375 89.925,39.375 92.263,41.713 92.263,43.698 92.612,44.047 93.434,44.047 93.498,44.111 v1(93.498,44.407)
FMC.HB_P16: IC4.W9 J5.f34 | length 47.2
  TopLayer w0.085: J5.f34@61.878,36.479 62.488,37.089 v1(62.488,37.11) ; v1(97.346,42.44) 97.287,42.499 97.287,42.674 97.121,42.84 97.121,43.342 97.38,43.6 97.38,46.382 97.554,46.556 97.948,46.556 97.998,46.606 IC4.W9@97.998,46.95
  MidLayer2 w0.11: v1(62.488,37.11) 62.488,36.658 62.393,36.563 62.187,36.563 61.953,36.797 61.953,37.478 62.175,37.7 67.915,37.7 68.602,37.013 69.373,37.013 69.741,37.381 74.106,37.381 74.4,37.675 89.973,37.675 93.7,41.402 93.7,42.35 93.8,42.45 94.5,43.15 96.35,43.15 96.716,42.784 97.265,42.784 97.33,42.719 97.33,42.456 97.336,42.45 v1(97.346,42.44)
FMC.HB_P17: IC4.Y4 J5.k37 | length 45
  TopLayer w0.085: J5.k37@56.798,32.669 57.408,33.279 v1(57.408,33.3) ; v1(90.923,42.4) 90.949,42.426 91.19,42.426 91.515,42.75 92.05,42.75 92.379,43.079 92.379,45.347 92.553,45.521 92.74,45.521 92.919,45.7 92.919,45.871 IC4.Y4@92.998,45.95
  BottomLayer w0.085: v1(57.408,33.3) 57.408,32.875 57.458,32.825 58.95,32.825 59.188,33.063 59.188,35.088 59.475,35.375 78.6,35.375 83.487,40.262 87.037,40.262 88.981,42.206 89.931,42.206 90.724,42.206 90.918,42.4 v1(90.923,42.4)
FMC.HB_P18: IC4.AB7 J5.j36 | length 45.4
  TopLayer w0.085: J5.j36@58.068,33.939 58.678,34.549 v1(58.678,34.57) ; v1(95.792,42.49) 95.792,42.472 95.605,42.284 95.534,42.284 95.433,42.386 95.433,43.116 95.604,43.287 95.604,43.825 95.682,43.903 95.951,43.903 IC4.AB7@95.998,43.95
  MidLayer2 w0.11: v1(58.678,34.57) 58.678,34.118 58.742,34.054 58.993,34.054 59.138,34.198 59.138,34.688 59.75,35.3 62.6,35.3 63.013,35.713 63.013,36.173 63.427,36.587 90.287,36.587 94.213,40.513 94.213,41.245 95.264,42.296 95.582,42.296 95.777,42.49 v1(95.792,42.49)
FMC.HB_P19: IC4.AA1 J5.e33 | length 41.4
  TopLayer w0.085: J5.e33@63.148,37.749 63.148,37.761 63.726,38.34 v1(63.726,38.352) ; v1(89.498,44.407) 89.498,44.45 IC4.AA1@89.998,44.95
  BottomLayer w0.085: v1(63.726,38.352) 63.726,37.862 63.776,37.812 68.263,37.812 68.813,37.262 74.912,37.262 76.55,38.9 77.137,39.487 cw(c77.423,39.201) 77.674,39.518 77.678,39.518 77.708,39.488 ; 77.709,39.487 77.884,39.313 ccw(c78.02,39.449) 78.156,39.313 ccw(c78.02,39.449) 78.156,39.585 77.137,40.604 cw(c77.423,40.89) 77.137,41.176 77.138,41.177 cw(c77.423,40.89) 77.709,41.176 79.046,39.839 ; 79.046,39.839 ccw(c79.182,39.975) 79.318,39.839 ; 79.318,39.839 ccw(c79.182,39.975) 79.318,40.111 77.981,41.448 cw(c78.267,41.734) 77.981,42.02 77.983,42.021 cw(c78.267,41.734) 78.553,42.02 79.89,40.683 ccw(c80.026,40.819) 80.163,40.683 ccw(c80.026,40.819) 80.163,40.955 79.67,41.448 cw(c79.956,41.734) 79.67,42.02 79.775,42.125 80.362,42.712 87.062,42.712 88.325,43.975 88.498,43.975 89.462,43.975 89.511,44.025 89.511,44.394 v1(89.498,44.407)
FMC.HB_P20: IC4.Y6 J5.f37 | length 46.3
  TopLayer w0.085: J5.f37@61.878,32.669 62.488,33.279 v1(62.488,33.3) ; v1(90.448,41.344) 90.454,41.344 90.648,41.15 92.098,41.15 94.38,43.432 94.38,45.167 94.769,45.556 94.948,45.556 94.998,45.606 IC4.Y6@94.998,45.95
  BottomLayer w0.085: v1(62.488,33.3) 62.488,32.862 62.556,32.794 81.466,32.794 84.786,36.114 84.891,36.219 ccw(c84.773,36.337) 84.891,36.455 84.446,36.901 cw(c84.714,37.169) 84.446,37.438 cw(c84.714,37.169) 84.983,37.438 86.119,36.301 ccw(c86.238,36.419) 86.356,36.301 ccw(c86.238,36.419) 86.356,36.538 85.246,37.648 cw(c85.514,37.917) 85.246,38.185 cw(c85.514,37.917) 85.783,38.185 86.202,37.766 ccw(c86.32,37.884) 86.439,37.766 86.802,38.129 89.823,41.15 90.249,41.15 90.443,41.344 v1(90.448,41.344)
FMC.HB_P21: IC4.AA8 J5.e36 | length 41.6
  TopLayer w0.085: J5.e36@63.148,33.939 63.758,34.549 v1(63.758,34.57) ; v1(95.229,41.299) 95.233,41.303 95.507,41.303 95.641,41.437 95.862,41.437 96.379,41.954 96.379,44.382 96.553,44.556 96.948,44.556 96.998,44.606 IC4.AA8@96.998,44.95
  MidLayer2 w0.11: v1(90.473,35.481) 90.528,35.537 90.702,35.537 90.835,35.67 94.942,39.777 94.942,40.755 95.145,40.959 95.21,41.023 95.21,41.279 v1(95.229,41.299)
  SignalLayer1 w0.11: v1(63.758,34.57) 63.758,34.118 63.822,34.054 89.293,34.054 90.449,35.209 90.449,35.457 v1(90.473,35.481)
FMC.LA_N0: IC4.B18 J5.g7 | length 66.1
  TopLayer w0.085: J5.g7@60.608,70.769 61.218,71.379 v1(61.218,71.4) ; v1(77.273,75.25) 77.273,75.245 77.079,75.051 77.079,73.594 78.886,71.787 88.761,71.787 89.611,70.937 89.625,70.937 89.774,70.937 ccw(c89.774,71.105) 89.941,71.105 89.941,71.249 cw(c90.321,71.249) 90.7,71.249 90.7,70.439 ccw(c90.868,70.439) 91.035,70.439 91.035,71.249 cw(c91.415,71.249) 91.794,71.249 91.794,70.439 ccw(c91.962,70.439) 92.129,70.439 92.129,71.223 cw(c92.509,71.223) 92.888,71.223 92.888,71.105 ccw(c93.056,71.105) 93.056,70.937 93.733,70.937 103.288,70.937 106.604,67.621 106.604,64.188 106.762,64.029 106.919,64.029 IC4.B18@106.998,63.95
  MidLayer2 w0.11: v1(61.218,71.4) 61.218,71.852 61.282,71.917 61.792,71.917 62.097,72.222 62.097,73.022 62.3,73.225 67.84,73.225 69.227,71.838 69.863,71.838 69.975,71.95 70.098,72.073 ccw(c69.821,72.35) 70.098,72.627 69.819,72.905 cw(c69.929,73.015) 69.819,73.124 cw(c69.929,73.015) 70.039,73.124 70.704,72.459 ccw(c70.981,72.737) 71.258,72.459 71.259,72.46 ccw(c70.981,72.737) 71.259,73.013 ; 71.258,73.014 cw(c71.368,73.123) 71.258,73.233 71.863,73.838 72.062,73.838 76.598,73.838 77.092,74.331 77.092,75.041 77.273,75.222 v1(77.273,75.25)
FMC.LA_N1: IC4.D19 J5.d9 | length 64
  TopLayer w0.085: J5.d9@64.418,68.229 64.418,68.708 64.468,68.758 65.15,68.758 69.217,68.758 70.885,67.09 70.885,67.087 71.01,66.963 ; 71.025,66.95 71.013,66.963 71.01,66.963 ; v1(82.673,67.775) 82.673,67.77 82.479,67.576 82.479,67.397 82.045,66.963 81.966,66.963 81.966,66.967 81.492,66.967 cw(c81.492,67.372) 81.088,67.372 81.088,67.484 ccw(c80.895,67.484) 80.895,67.677 ccw(c80.895,67.484) 80.703,67.484 80.703,67.06 cw(c80.298,67.06) 80.298,66.656 cw(c80.298,67.06) 79.894,67.06 79.894,67.484 ccw(c79.701,67.484) 79.701,67.677 ccw(c79.701,67.484) 79.509,67.484 79.509,67.06 cw(c79.104,67.06) 79.104,66.656 cw(c79.104,67.06) 78.7,67.06 78.7,67.484 ccw(c78.507,67.484) 78.507,67.677 ccw(c78.507,67.484) 78.315,67.484 78.315,67.06 cw(c77.91,67.06) 77.91,66.656 cw(c77.91,67.06) 77.506,67.06 77.506,67.484 ccw(c77.313,67.484) 77.313,67.677 ccw(c77.313,67.484) 77.121,67.484 77.121,67.06 cw(c76.716,67.06) 76.716,66.656 cw(c76.716,67.06) 76.312,67.06 76.312,67.484 ccw(c76.119,67.484) 76.119,67.677 ccw(c76.119,67.484) 75.927,67.484 75.927,67.06 cw(c75.522,67.06) 75.522,66.656 cw(c75.522,67.06) 75.118,67.06 75.118,67.484 ccw(c74.925,67.484) 74.925,67.677 ccw(c74.925,67.484) 74.733,67.484 74.733,67.06 cw(c74.328,67.06) 74.328,66.656 cw(c74.328,67.06) 73.924,67.06 73.924,67.484 ccw(c73.731,67.484) 73.731,67.677 ccw(c73.731,67.484) 73.539,67.484 73.539,67.06 cw(c73.134,67.06) 73.134,66.656 cw(c73.134,67.06) 72.73,67.06 72.73,67.484 ccw(c72.537,67.484) 72.537,67.677 ccw(c72.537,67.484) 72.345,67.484 72.345,67.367 cw(c71.94,67.367) 71.94,66.963 71.792,66.963 71.009,66.963 ; IC4.D19@107.998,61.95 v1(108.498,62.45)
  MidLayer2 w0.11: v1(82.673,67.775) 82.673,67.747 82.492,67.566 82.492,66.284 85,63.775 89.15,63.775 90.437,65.062 102.898,65.062 103.873,64.087 106.884,64.087 107.087,63.884 107.087,62.151 107.151,62.087 108.434,62.087 108.498,62.151 v1(108.498,62.45)
FMC.LA_N2: IC4.E17 J5.h8 | length 67.1
  TopLayer w0.085: J5.h8@59.338,69.499 59.948,70.109 v1(59.948,70.13) ; IC4.E17@105.998,60.95 v1(106.498,61.45)
  MidLayer2 w0.11: v1(59.948,70.13) 59.948,70.582 60.012,70.647 60.222,70.647 60.75,71.175 60.75,74.136 60.944,74.331 69.656,74.331 70.33,75.005 75.355,75.005 76.175,75.825 79.115,75.825 80.99,73.95 88.125,73.95 90.118,71.957 94.857,71.957 94.952,71.863 102.288,71.863 102.638,72.213 104.863,72.213 105.326,72.676 105.616,72.676 v1(105.647,72.706)
  BottomLayer w0.085: v1(105.647,72.706) 105.619,72.678 105.382,72.678 105.319,72.616 105.319,72.492 105.525,72.287 105.525,68.3 105.05,67.825 105.05,67.175 105.35,66.875 105.35,66.45 105.35,63.4 105.666,63.084 105.791,63.084 106.137,62.738 106.137,61.33 105.988,61.18 105.988,61.11 106.038,61.06 106.108,61.06 v1(106.498,61.45)
FMC.LA_N3: IC4.E18 J5.g10 | length 63.4
  TopLayer w0.085: J5.g10@60.608,66.959 61.218,67.569 v1(61.218,67.59) ; IC4.E18@106.998,60.95 v1(107.497,61.448)
  MidLayer2 w0.11: v1(61.218,67.59) 61.218,68.042 61.282,68.107 61.472,68.107 62,68.635 62,69.163 62.175,69.338 62.723,69.338 63.2,69.815 63.2,70.388 63.475,70.663 72.523,70.663 74.323,72.463 76.963,72.463 78,73.5 79.99,73.5 80.565,72.925 86.44,72.925 88.752,70.613 93.965,70.613 94.033,70.681 99.02,70.681 99.088,70.613 104.313,70.613 104.675,70.975 106.325,70.975 106.738,70.562 106.738,70.313 106.574,70.148 106.574,69.934 106.392,69.753 v1(106.392,69.725)
  BottomLayer w0.085: v1(106.392,69.725) 106.392,69.72 106.586,69.526 106.586,66.45 106.586,64.364 106.9,64.05 106.9,62.075 107.162,61.813 107.787,61.813 107.925,61.675 107.925,61.19 107.79,61.055 107.547,61.055 107.497,61.106 v1(107.497,61.448)
FMC.LA_N4: IC4.B22 J5.h11 | length 63.2
  TopLayer w0.085: J5.h11@59.338,65.689 59.948,66.299 v1(59.948,66.32) ; v1(79.223,72.45) 79.42,72.646 79.669,72.646 79.672,72.644 89.006,72.644 89.2,72.45 89.725,71.925 102.306,71.925 102.438,72.057 106.743,72.057 111.988,66.812 111.988,64.375 111.198,63.585 111.127,63.585 111.077,63.634 111.077,63.871 IC4.B22@110.998,63.95
  MidLayer2 w0.11: v1(59.948,66.32) 59.948,66.772 60.012,66.837 61.487,66.837 61.925,67.275 61.925,67.65 62.275,68 62.936,68 63.225,68.289 63.225,69.05 63.638,69.463 72.963,69.463 74.45,70.95 77.119,70.95 78.8,72.631 79.014,72.631 79.195,72.45 v1(79.223,72.45)
FMC.LA_N5: IC4.A16 J5.d12 | length 67.7
  TopLayer w0.085: J5.d12@64.418,64.419 64.411,64.426 64.411,64.816 64.225,65.002 64.048,65.002 63.69,65.36 63.69,65.915 64.162,66.387 64.786,66.387 65.175,65.998 65.175,65.45 65.465,65.16 69.085,65.16 69.26,65.16 70.004,65.904 ccw(c69.885,66.022) 70.053,66.022 70.053,66.581 cw(c70.432,66.581) 70.812,66.581 70.812,65.315 ccw(c70.979,65.315) 71.147,65.315 71.147,65.895 cw(c71.526,65.895) 71.526,66.275 71.675,66.275 81.975,66.275 83.174,67.474 83.174,68.5 84.761,70.087 87.511,70.087 88.17,69.428 88.723,68.875 89.139,68.875 cw(c89.139,68.495) 89.519,68.495 89.519,68.486 ccw(c89.686,68.486) 89.854,68.486 89.854,69.032 cw(c90.233,69.032) 90.613,69.032 90.613,68.486 ccw(c90.78,68.486) 90.948,68.486 90.948,69.032 cw(c91.327,69.032) 91.707,69.032 91.707,68.486 ccw(c91.874,68.486) 92.042,68.486 92.042,69.032 cw(c92.421,69.032) 92.801,69.032 92.801,68.486 ccw(c92.968,68.486) 93.136,68.486 93.136,69.032 cw(c93.515,69.032) 93.895,69.032 93.895,68.486 ccw(c94.062,68.486) 94.23,68.486 94.23,69.032 cw(c94.609,69.032) 94.989,69.032 94.989,68.486 ccw(c95.156,68.486) 95.324,68.486 95.324,69.032 cw(c95.703,69.032) 96.083,69.032 96.083,68.486 ccw(c96.25,68.486) 96.418,68.486 96.418,69.032 cw(c96.797,69.032) 97.177,69.032 97.177,68.486 ccw(c97.344,68.486) 97.512,68.486 97.512,69.032 cw(c97.891,69.032) 98.271,69.032 98.271,68.486 ccw(c98.438,68.486) 98.606,68.486 98.606,68.495 cw(c98.985,68.495) 98.985,68.875 99.138,68.875 99.443,69.181 99.685,69.181 101.911,69.181 104.604,66.488 104.604,65 104.654,64.95 IC4.A16@104.998,64.95
FMC.LA_N6: IC4.B16 J5.c11 | length 69.6
  TopLayer w0.085: J5.c11@65.688,65.689 66.298,66.299 v1(66.298,66.32) ; v1(71.348,68.392) 71.413,68.392 71.555,68.25 71.625,68.25 71.734,68.359 77.282,68.359 77.499,68.576 77.604,68.681 ccw(c77.485,68.8) 77.604,68.918 76.766,69.756 cw(c77.034,70.025) 76.766,70.293 cw(c77.034,70.025) 77.267,70.324 77.271,70.324 78.771,68.824 ccw(c78.89,68.943) 79.008,68.824 ccw(c78.89,68.943) 79.008,69.061 ; 79.007,69.062 77.761,70.308 cw(c78.029,70.576) 77.761,70.845 cw(c78.029,70.576) 78.298,70.845 78.618,70.524 78.914,70.228 ccw(c79.033,70.347) 79.151,70.228 79.533,70.61 79.885,70.962 79.9,70.962 80.35,70.962 cw(c80.35,70.583) 80.73,70.583 80.73,69.337 ccw(c80.897,69.337) 81.065,69.337 81.065,70.778 cw(c81.444,70.778) 81.824,70.778 81.824,69.337 ccw(c81.991,69.337) 82.159,69.337 82.159,70.778 cw(c82.538,70.778) 82.918,70.778 82.918,69.371 ccw(c83.085,69.371) 83.253,69.371 83.253,70.778 cw(c83.632,70.778) 84.012,70.778 84.012,70.465 ccw(c84.179,70.465) 84.347,70.465 84.347,70.583 cw(c84.726,70.583) 84.726,70.962 84.875,70.962 88.211,70.962 89.348,69.825 98.348,69.825 98.541,70.018 99.142,70.018 99.31,70.187 102.265,70.187 104.466,67.986 105.592,66.86 105.592,64.567 105.373,64.348 104.773,64.348 104.604,64.179 104.604,64.091 104.69,64.006 104.942,64.006 IC4.B16@104.998,63.95
  MidLayer2 w0.11: v1(66.298,66.32) 66.298,66.794 66.234,66.858 65.867,66.858 65.563,67.162 65.563,68.023 65.927,68.387 67.838,68.387 68.525,67.7 69.19,67.7 69.515,68.025 71.261,68.025 71.34,68.104 71.34,68.384 v1(71.348,68.392)
FMC.LA_N7: IC4.A19 J5.h14 | length 61.4
  TopLayer w0.085: J5.h14@59.338,61.879 59.948,62.489 v1(59.948,62.51) ; v1(107.798,67.675) 107.798,67.67 107.604,67.476 107.604,67.001 107.604,65.125 107.707,65.022 107.926,65.022 IC4.A19@107.998,64.95
  MidLayer2 w0.11: v1(59.948,62.51) 59.948,62.954 59.875,63.027 59.477,63.027 59.163,63.34 59.163,63.998 59.577,64.412 60.323,64.412 60.737,63.998 60.737,63.475 61.012,63.2 62.6,63.2 63.05,63.65 63.05,64.598 63.964,65.512 70.387,65.512 72.912,68.037 77.112,68.037 80.287,71.212 84.373,71.212 86.673,68.912 95.498,68.912 96.168,68.243 100.168,68.243 100.494,68.569 107.166,68.569 107.617,68.119 107.617,67.884 107.798,67.703 v1(107.798,67.675)